# Altium PCB slave.PcbDoc (part 2 of 7)
Units mil, origin at the board's own origin, x right, y up, seen from the top; angles counter-clockwise.
Board outline 6299.21 x 3937.01 mil, 6 copper layers (Top Copper, FUSED_VBAT-, Signal Layer 2, Signal Layer 3, VREG, Bot Copper), stack 65.355 mil thick; 495 components, 307 nets, 1435 pads, 1866 vias.
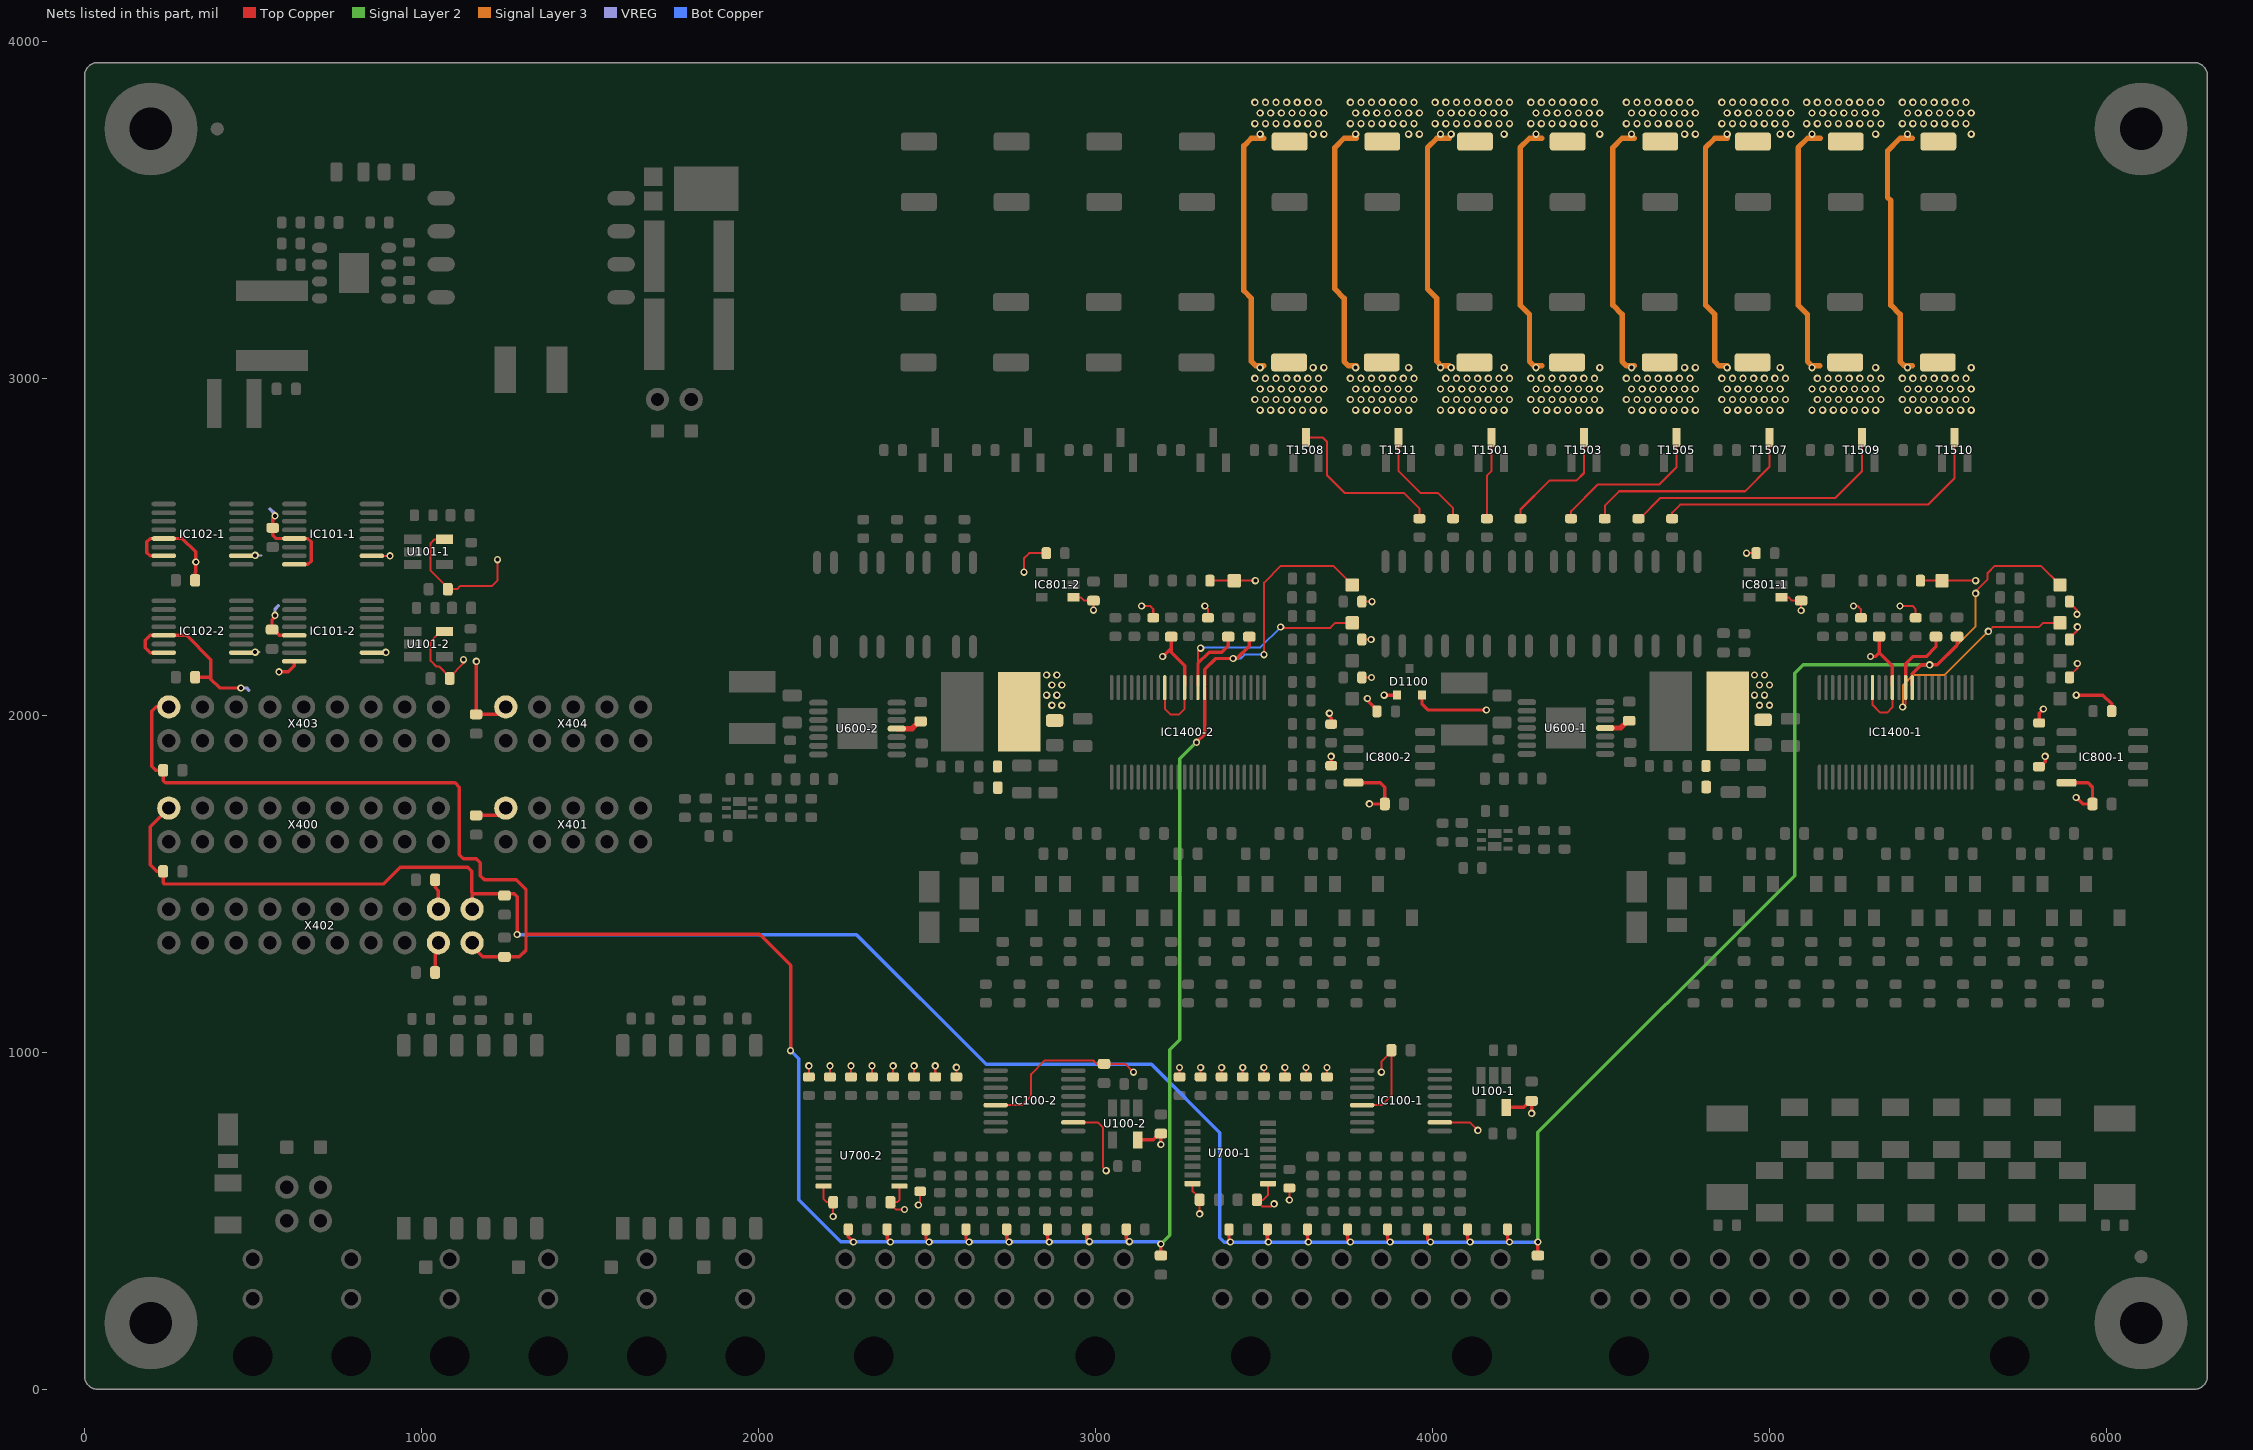
[diagram p6: the nets of this part, all layers, seen from the top]

## Footprints (in the part's own frame and the unit in brackets; to place one, negate y for a bottom-side part, rotate by r counter-clockwise, add the part's x,y. Pads: shape width x height; smd on the part's side, far side on the other; paste and mask are expansions set on the pad) (continued)
RESC2012X05N [mm] "Chip Resistor, 2-Leads, Body 2,00x1,20mm, IPC Medium Density"
  rrect40% 0.95x1.3 smd: 1(-0.925,0) 2(0.925,0)
  silkscreen extent -0.05,-0.55 0.05,0.55, body extent -1.05,-0.65 1.05,0.65, height 0.5
RESC5025X07N [mm] "Chip Resistor, 2-Leads, Body 5,00x2,50mm, IPC Medium Density"
  rrect30% 1.35x2.7 smd: 1(-2.275,0) 2(2.275,0)
  silkscreen extent -1.2,-1.25 1.2,1.25, body extent -2.6,-1.35 2.6,1.35, height 0.7
SOIC127P600X175-8N [mm] "SOIC, 8-Leads, Body 4,90x3,90mm, Pitch 1,27mm, IPC Medium Density"
  rrect50% 1.5x0.6 smd: 1(-2.7,1.905) 2(-2.7,0.635) 3(-2.7,-0.635) 4(-2.7,-1.905) 5(2.7,-1.905) 6(2.7,-0.635) 7(2.7,0.635) 8(2.7,1.905)
  silkscreen extent -2.8,-2.45 1.55,2.8, body extent -3,-2.45 3,2.45, height 1.75
SOIC127P700X220-4N [mm] "SOIC, 4-Leads, Body 2,60x4,40mm, Pitch 1,27mm, IPC Medium Density"
  oval 1.75x0.6 smd: 1(-3.175,0.635) 2(-3.175,-0.635) 3(3.175,-0.635) 4(3.175,0.635)
  silkscreen extent -3.3,-1.45 1.9,1.61, body extent -3.5,-1.45 3.5,1.45, height 2.2
SOT-23-OT5_L [mm] "SOT23, 5-Leads, Body 2.9x1.7mm, Pitch 0.95mm, Lead Span 2.8mm, IPC High Density"
  rect 0.9x0.65 smd: 1(-1.2,0.95) 2(-1.2,0) 3(-1.2,-0.95) 4(1.2,-0.95) 5(1.2,0.95)
  silkscreen extent -1.33,-1.55 0.35,1.95, body extent -0.9,-1.55 0.9,1.55, height 1.45
Testpoint_S1 [mm] "Testpunkt, quardratisch 1mm"
  rrect20% 1x1 smd paste-0.5: 1(0,0)
TYS6045221M-10 [mm] "Precision Wire Wound Inductor, 2-Leads, Body 6,00x6,00mm, IPC Medium Density"
  rect 3.2x6 smd: 1(-2.15,0) 2(2.15,0)
  silkscreen extent -4.05,-3.15 0.15,3.15, body extent -3.1,-3 3.1,3, height 4.8
VISH-DO-214AC-2_N [mm] "DO-214AC, 2-Leads, Body 4.5x2.79mm, IPC Medium Density"
  rect 2.4x1.55 smd: 1(-1.525,0) 2(1.525,0)
  silkscreen extent -3.4,-1.4 2.25,1.4, body extent -2.25,-1.4 2.25,1.39, height 2.29
"WE-LQS 4018" [mm] "SMD Power Inductor, 2-Leads, Body 4.0x4.0mm"
  rect 1.1x3.7 smd: 1(-1.5,0) 2(1.5,0)
  body extent -2,-2 2,2, height 1.78
WE_750313457 [mm] "Würth Elektronik 750313457"
  oval 2.08x1.07 smd: 1(-6.78,-3.735) 2(-6.78,-1.245) 3(-6.78,1.245) 4(-6.78,3.735) 5(6.78,3.735) 6(6.78,1.245) 7(6.78,-1.245) 8(6.78,-3.735)
  silkscreen extent -6.98,-6.65 5.43,6.65, body extent -7.62,-6.65 7.62,6.65, height 11.44

## Part data
C100-1 C100-2 C400 C401 C402 C403 C404 C405 C406 C407 C601-1 C601-2 C604-1 C604-2 C605-1 C605-2 C700-1 C700-2 C701-1 C701-2 C800-1 C800-2 C801-1 C801-2 C906 C1100: library part gen_C_ceramic_100n_50V_X7R_0603, "MLCC", Capacitance=100n, Case EIA=0603, Case Metric=1608, Dielectric=X7R, PnP Package=C_0603_10, PnP Value=100n/50V/X7R, Rated Voltage=50V, Supplier Part Number 1=2525267, Part Number=gen_C_ceramic_100n_50V_X7R_0603, PnP equipped=x, Supplier 1=Farnell, Supplier 2=Digikey, Supplier Part Number 2=490-6049-1-ND
  C100-1 C100-2 C601-1 C601-2 C604-1 C604-2 C605-1 C605-2 C700-1 C700-2 C701-1 C701-2: Automotive Qualified=True, Supplier 3=Farnell, Supplier Part Number 3=2070398
  C400 C401 C402 C403 C404 C405 C406 C407 C800-1 C800-2 C801-1 C801-2 C906 C1100: Automotive Qualified=False
C101-1 C101-2 C110-1 C110-2 C112-1 C112-2 C113-1 C113-2 C114-1 C114-2 C606-1 C606-2 C904 C907 C1401-1 C1401-2 C1402-1 C1402-2 C1403-1 C1403-2: library part gen_C_ceramic_1u_35V_X7R_0603, "MLCC", Capacitance=1u, Case EIA=0603, Case Metric=1608, Dielectric=X7R, PnP Package=C_0603_10, PnP Value=1uF/35V/X7R, Rated Voltage=35V, Supplier Part Number 1=1907508, Automotive Qualified=False, Part Number=gen_C_ceramic_1u_35V_X7R_0603, PnP equipped=x, Supplier 1=Farnell
C102-1 C102-2 C103-1 C103-2 C104-1 C104-2 C105-1 C105-2 C106-1 C106-2 C107-1 C107-2 C108-1 C108-2 C109-1 C109-2 C600-1 C600-2: library part gen_C_ceramic_10n_100V_X7R_0603, "MLCC", Capacitance=10n, Case EIA=0603, Case Metric=1608, Dielectric=X7R, Rated Voltage=100V, Supplier Part Number 1=1301715, Automotive Qualified=True, Part Number=gen_C_ceramic_10n_100V_X7R_0603, Supplier 1=Farnell, Supplier 2=Farnell, Supplier 3=Farnell, Supplier Part Number 2=2821192, Supplier Part Number 3=2210878
C111-1 C111-2 C115-1 C115-2 C1300-1 C1300-2 C1301-1 C1301-2 C1302-1 C1302-2 C1303-1 C1303-2 C1304-1 C1304-2 C1305-1 C1305-2 C1306-1 C1306-2 C1307-1 C1307-2 C1308-1 C1308-2 C1309-1 C1309-2 C1310-1 C1310-2 C1311-1 C1311-2 C1312-1 C1312-2 C1313-1 C1313-2 C1314-1 C1314-2 C1315-1 C1315-2 C1316-1 C1316-2 C1317-1 C1317-2 C1318-1 C1318-2 C1319-1 C1319-2 C1320-1 C1320-2 C1321-1 C1321-2 C1322-1 C1322-2 C1323-1 C1323-2: library part gen_C_ceramic_10n_100V_X7R_0603, "MLCC", Capacitance=10n, Case EIA=0603, Case Metric=1608, Dielectric=X7R, Rated Voltage=100V, Supplier Part Number 1=1865545, Automotive Qualified=False, Part Number=gen_C_ceramic_10n_100V_X7R_0603, Supplier 1=Farnell
C602-1 C602-2: library part gen_C_ceramic_1u_250V_X7R_1812, "MLCC", Capacitance=1u, Case EIA=1812, Case Metric=4532, Dielectric=X7T, Rated Voltage=250V, Supplier Part Number 1=2435499, Automotive Qualified=True, Part Number=gen_C_ceramic_1u_250V_X7R_1812, Supplier 1=Farnell
C603-1 C603-2 C1400-1 C1400-2: library part gen_C_ceramic_100n_100V_X7R_0805, "MLCC", Capacitance=100n, Case EIA=0805, Case Metric=2012, Dielectric=X7R, Rated Voltage=100V, Supplier Part Number 1=2320821, Automotive Qualified=False, Part Number=gen_C_ceramic_100n_100V_X7R_0805, Supplier 1=Farnell
C607-1 C607-2 C608-1 C608-2: library part gen_C_ceramic_2u2_10V_X7R_0805, "MLCC", Capacitance=2u2, Case EIA=0805, Case Metric=2012, Dielectric=X7R, Rated Voltage=10V, Supplier Part Number 1=2478259, Automotive Qualified=True, Part Number=gen_C_ceramic_2u2_10V_X7R_0805, Supplier 1=Farnell, Supplier 2=Farnell, Supplier Part Number 2=2070513
C900 C901: library part gen_C_ceramic_2u2_250V_X7R_2220, "MLCC", Capacitance=2u2, Case EIA=2220, Case Metric=5750, Dielectric=X7R, Rated Voltage=250V, Supplier Part Number 1=445-7997-2-ND, Automotive Qualified=True, Part Number=gen_C_ceramic_2u2_250V_X7R_2220, Supplier 1=Digikey
C902: library part gen_C_ceramic_470p_100V_X7R_0805, "MLCC", Capacitance=470p, Case EIA=0805, Case Metric=2012, Dielectric=X7R, Rated Voltage=100V, Supplier Part Number 1=1759283, Automotive Qualified=False, Part Number=gen_C_ceramic_470p_100V_X7R_0805, Supplier 1=Farnell
C903: library part gen_C_ceramic_4n7_1000V_X7R_1812, "MLCC", Capacitance=4n7, Case EIA=1812, Case Metric=4532, Dielectric=X7R, Rated Voltage=1000V, Supplier Part Number 1=1702159, Automotive Qualified=False, Part Number=gen_C_ceramic_4n7_1000V_X7R_1812, Supplier 1=Farnell
C905: library part gen_C_ceramic_22u_50V_X7R_2220_stacked, "MLCC", Capacitance=22u, Case EIA=2220, Case Metric=5750, Dielectric=X7R, Rated Voltage=50V, Supplier Part Number 1=399-5797-1-ND, Automotive Qualified=True, Part Number=gen_C_ceramic_22u_50V_X7R_2220_stacked, Supplier 1=Digikey
C1404-1 C1404-2 C1405-1 C1405-2: library part gen_C_ceramic_100p_50V_C0G_0603, "MLCC", Capacitance=100p, Case EIA=0603, Case Metric=1608, Dielectric=C0G, Rated Voltage=50V, Supplier Part Number 1=1414603, Automotive Qualified=False, Part Number=gen_C_ceramic_100p_50V_C0G_0603, Supplier 1=Farnell
D900: library part PDS3200-13, "Schottky Diode 3A 200V 780mV", Breakdown Voltage=200V, Continuous Forward Current=3A, Manufacturer="DIODES Inc", Operating Temperature="-65°C - +150°C", Supplier Part Number 1=1713904, Automotive Qualified=True, ComponentLink1Description=Datasheet, ComponentLink1URL=http://www.farnell.com/datasheets/2238298.pdf, Part Name=PDS3200, Part Number=PDS3200-13, Supplier 1=Farnell
D901 D1400-1 D1400-2: library part CMP-2000-05099-1, "1 A High Voltage Schottky Barrier Rectifier, 0.62 V, -55 to 175 degC, 2- Pin POWERDI123, Pb-Free, Tape and Reel", Average Rectified Current-Max=1A, Forward Voltage=0.77V, Manufacturer="Diodes Inc", Peak Current-Max=40A, Reverse Current-Max=1µA, Reverse Voltage-Max [Vrrm]=100V, Datasheet URL=https://datasheet.ciiva.com/15144/getdatasheetpartid-44146-15144126.pdf, Datasheet Version=Sep-14, Manufacturer URL=http://www.diodes.com/
D1100: library part CMP-2000-04915-1, "Schottky Barrier Diode, 30 V, 3-Pin SOT23, RoHS, Tape and Reel", Current Ifsm=600mA, Diode Case Style=SOT-23, Forward Current If(AV)=200mA, Forward Voltage=800mV, Junction Temperature Tj Max=125degC, Manufacturer="NXP Semiconductors", Operating Temperature Max=150degC, Operating Temperature Min=-65degC, Operating Temperature Range=-65degCto+150degC, Package Description="3-Pin Small Outline Transistor, Body 1.3 x 2.9 mm, Pitch 0.95 mm", Package Reference=SOT23-3, Package Version=Feb-16, Repetitive Reverse Voltage Vrrm Max=30V, Common Connection=Cathode, Datasheet URL=https://datasheet.ciiva.com/33723/1668625-33723936.pdf, Datasheet Version="Rev. 5 , 10/2012", Diode Type=Schottky, Forward Surge Current Ifsm Max=600mA, Forward Voltage VF Max=800mV, Manufacturer URL=http://www.nxp.com/, No. of Pins=3, Package / Case=SOT-23, Package URL=http://www.nxp.com/documents/outline_drawing/SOT23.pdf, Pin Configuration=1A1,2A2,3comK, Reel Quantity=3000, Reverse Recovery Time trr Max=5ns, Reverse Recovery Time trr Typ=5ns, SMD Marking=L43/*W1, SVHC=NoSVHC(19-Dec-2012), Tape Width=8mm, Termination Type=SMD
D1401-1 D1401-2: library part CMP-0548-00258-2, "Transient Voltage Suppressor, 6.40 to 231 V, 60 V Stand-off Voltage, Uni-Directional, -55 to 155 degC, 2-pin DO-214AC, Pb-Free, Tape and Reel", Manufacturer="Vishay Semiconductor", Operating Junction and Storage Temperature Range="-55 to 150 degC", ComponentLink1Description="Manufacturer URL", ComponentLink1URL=http://www.vishay.com/, ComponentLink2Description=Datasheet, ComponentLink2URL=http://www.vishay.com/docs/88390/smaj50a.pdf, ComponentLink3Description="Package Specification", ComponentLink3URL=http://www.vishay.com/docs/88390/smaj50a.pdf, DatasheetVersion=12/8/2013, ID (uA)=1, IFSM="40 A", Mounting Technology="Surface Mount", PackageDescription="2-Pin DO-214AC (SMA), Body 4.245 x 2.665 mm", PackageReference=DO-214AC-2, Packing="Tape and Reel", PartNumber=SMAJ60A-E3/61, PPPM (W)="400, 300", RoHS=TRUE, VBR Uni-Directional (V)="6.4 to 231", VWM (V)=60
Designator26 Designator27 Designator28-1 Designator29: library part Hole_3.2_Iso
F300 F314: "Fuse, Surface Mount, NANO2 Series, 500 mA, 125 VAC, 32 VDC, Very Fast Acting, SMD", Manufacturer=Littlefuse, Operating Temperature="-55°C - +125°C", Supplier Part Number 1=1596919, Automotive Qualified=False, ComponentLink1Description=Datasheet, ComponentLink1URL=http://www.farnell.com/datasheets/1792947.pdf, Part Number=fuse_0.5A_0448.500MR, Supplier 1=Farnell
F301 F302 F303 F304 F305 F306 F307 F308 F309 F310 F311 F312 F313: "Fuse, Surface Mount, 466 Series, 250 mA, 125 VAC, 125 VDC, Very Fast Acting, 1206", Manufacturer=Littlefuse, Operating Temperature="-55°C - +90°C", Supplier Part Number 1=9921826, Automotive Qualified=False, ComponentLink1Description=Datasheet, ComponentLink1URL=http://www.farnell.com/datasheets/1796765.pdf, Part Number=fuse_0.25A_0466.250NR, Supplier 1=Farnell
F900: "Fuse, Surface Mount, 466 Series, 1.25 A, 63 VAC, 63 VDC, Very Fast Acting, 1206", Manufacturer=Littlefuse, Operating Temperature="-55°C - +90°C", Supplier Part Number 1=1596526, Automotive Qualified=False, ComponentLink1Description=Datasheet, ComponentLink1URL=http://www.farnell.com/datasheets/1796765.pdf, Part Number=fuse_1.25A_04661.25NR, Supplier 1=Farnell
IC100-1 IC100-2 IC101-1 IC101-2 IC102-1 IC102-2: library part CMP-0798-00197-1, "CMOS, Low Voltage, 2-Wire Serially Controlled, Matrix Switch, -40 to 85 degC, 16-pin SOP (RU-16), Tube", Manufacturer="Analog Devices", Bandwidth (Hz)=65M, Code_JEDEC=MO-153AB, ComponentLink1Description="Manufacturer URL", ComponentLink1URL=http://www.analog.com/en/index.html, ComponentLink2Description=Datasheet, ComponentLink2URL=http://www.analog.com/static/imported-files/data_sheets/ADG728_729.pdf, ComponentLink3Description="Package Specification", ComponentLink3URL=http:/www.analog.com/static/imported-files/packages/36244347913743854010197452789RU16.pdf, DatasheetVersion="Rev. C", Max Analog Signal Range="0 to Vdd", Mounting Technology="Surface Mount", PackageDescription="16-Pin Thin Shrink Small Outline Package, Body 5 x 4.4 mm, Pitch 0.65 mm", PackageReference=RU-16, PackageVersion=Nov-02, Packing=Tube, PartNumber=ADG728BRUZ, Ron (ohms)=2.5, Supply V Guar Performance="Single_(+3V), Single_(+5V)"
IC800-1 IC800-2: "Automotive 2-Mbit serial I²C  / bus EEPROM with 1 MHz clock", Manufacturer=STMicroelectronics, Operating Temperature="-40°C - +125°C", PnP Package=SO8N, Supplier Part Number 1=497-16238-1-ND, Automotive Qualified=True, ComponentLink1Description=Datasheet, ComponentLink1URL=http://www.st.com/content/ccc/resource/technical/document/datasheet/83/f4/3e/e4/4e/49/42/c5/DM00200595.pdf/files/DM00200595.pdf/jcr:content/translations/en.DM00200595.pdf, Part Name=M24M02-DWMN3TP/K, Part Number=M24M02-DWMN3TP/K, Supplier 1=Digikey, Supplier 2=Mouser, Supplier Part Number 2=511-M24M02-DWMN3TP/K
IC801-1 IC801-2: library part CMP-0192-00211-1, "2-Wire High-Accuracy Temperature Sensor, Slave Address 000, 5-Pin SOT-23, -55°C to +125°C Temperature, Tape and Reel", Code_IPC=SOT23-5, DatasheetVersion="revD, Nov-2010", PackageDescription="5-Lead Plastic Small Outline Transistor (OT) [SOT-23]", PackageReference=SOT-23-OT5, PackageVersion="revBB, Aug-2009"
IC900: library part CMP-0492-02715-1, "Micropower No-Opto Isolated Flyback Converter, 2.8 to 42 V, -40 to 150 degC, 8-Pin SOIC (S8E), RoHS, Tube", Output Current="3.6 A", PartNumber=LT8302, Temperature Max="150 degC", Temperature Min="-40 degC", ComponentLink1Description="Manufacturer URL", ComponentLink1URL=http://www.linear.com/, ComponentLink2Description=Datasheet, ComponentLink2URL=http://cds.linear.com/docs/en/datasheet/8302fa.pdf, ComponentLink3Description="Package Specification", ComponentLink3URL=http://cds.linear.com/docs/en/packaging/05081857_A_S8E.pdf, DatasheetVersion="Rev. A", Mounting Technology="Surface Mount", Number of Outputs=1, PackageDescription="8-Pin Plastic Small Outline Integrated Circuit Package, Body 4.90 x 3.90 mm, Pitch 1.27 mm", PackageVersion="Rev. A, 10/2013", Packing=Tube, RoHS=TRUE, VIN Max="42 V", VIN Min="2.8 V"
IC1400-1 IC1400-2: "Multicell Battery Monitor, 60 V Vin MAX, 48-pin SOP (G-48), -40 to 125 degC, Pb-Free", Manufacturer="Linear Technology", Operating Temperature="-40°C - +125°C", Supplier Part Number 1=LTC6811HG-1#PBF-ND, Automotive Qualified=False, Battery Chemistry="Li-Ion, Li-Polymer, NiMH", ComponentLink1Description=Datasheet, ComponentLink1URL=https://cds.linear.com/docs/en/datasheet/68111fb.pdf, ComponentLink2Description=Datasheet, ComponentLink2URL=http://cds.linear.com/docs/en/datasheet/680412f.pdf, ComponentLink3Description="Package Specification", ComponentLink3URL=http://cds.linear.com/docs/en/packaging/05081887_0_G48.pdf, Mounting Technology="Surface Mount", Number of Cells="> 1000 V of stacked Li-Ion cells", PackageDescription="48-Pin Plastic SSOP, Body 12.8 x 5.3 mm, Pitch 0.5 mm", PackageReference=G-48, PackageVersion="Rev. Ø, 01/2011", Part Name=LTC6811HG-1#PBF, Part Number=LTC6811HG-1#PBF, PartNumber=LTC6811HG-1#PBF, RoHS=TRUE, Supplier 1=Digikey, Type of Charger="Battery Stack Monitor", Vin Max(V)=60
L600-1 L600-2: library part TYS6045221M-10, "Power Inductor", Manufacturer="Laird-Signal Integrity Products", Operating Temperature="-55°C - +150°C", Rated Current=590mA, Saturation Current=700mA, Supplier Part Number 1=240-2742-1-ND, Automotive Qualified=True, ComponentLink1Description=Datasheet, ComponentLink1URL=http://assets.lairdtech.com/home/brandworld/files/TYS6045221M-10.pdf, Inductance=220µH, Part Number=TYS6045221M-10, Supplier 1=Digikey
L900: library part CMP-1354-00028-1, "WE-LQS SMD Power Inductor, L=10 µH", Inductance="10 µH", Manufacturer="Wuerth Elektronik", ComponentLink1Description="Manufacturer URL", ComponentLink1URL=http://www.we-online.com, ComponentLink2Description=Datasheet, ComponentLink2URL=http://katalog.we-online.de/pbs/datasheet/74404042100.pdf, PackageReference="WE-LQS 4018", PartNumber=74404042100
LD1400-1 LD1400-2: library part gen_LED_0603_green, "LED", Breakdown Voltage=5V, Color=green, Continuous Forward Current=20mA, Forward Voltage @ 20mA=2.2V, PnP Package=LED_0603, Supplier Part Number 1=2099223, Automotive Qualified=False, Part Number=gen_LED_0603_green, Supplier 1=Farnell
Q600-1 Q600-2: "Dual NPN/PNP Transistor", Manufacturer=Nexperia, Maximum Continous Drain Current (25°C)=1A, Maximum Drain-Source Voltage=120V, Operating Temperature="-55°C - +150°C", Part Name="DUAL PNP/NPN", Automotive Qualified=True, ComponentLink1Description=Datasheet, ComponentLink1URL=https://assets.nexperia.com/documents/data-sheet/PBSS4112PANP.pdf, Part Number=PBSS4112PANP, Supplier 2=Digikey, Supplier 3=Mouser, Supplier Part Number 2=1727-1068-1-ND, Supplier Part Number 3=771-PBSS4112PANP
R100-1 R100-2 R101-1 R101-2 R102-1 R102-2 R103-1 R103-2 R104-1 R104-2 R105-1 R105-2 R106-1 R106-2 R107-1 R107-2 R600-1 R600-2 R604-1 R604-2 R609-1 R609-2 R700-1 R700-2 R701-1 R701-2 R702-1 R702-2 R703-1 R703-2 R704-1 R704-2 R705-1 R705-2 R706-1 R706-2 R707-1 R707-2 R708-1 R708-2 R800-1 R800-2 R801-1 R801-2 R904 R1112 R1404-1 R1404-2 R1408-1 R1408-2 R1411-1 R1411-2: library part gen_R_10k_0603, "SMD Resistor 10k 0603", Case EIA=0603, Case Metric=1608, Maximum Working Voltage=75V, Operating Temperature="-55°C - +155°C", PnP Package=R_0603, Power=0.1W, Supplier Part Number 1=2073349, Tolerance=1%, Part Number=gen_R_10k_0603, PnP Value=10k, Resistance=10k, Series="E24, E96", Supplier 1=Farnell
  R100-1 R100-2 R101-1 R101-2 R102-1 R102-2 R103-1 R103-2 R104-1 R104-2 R105-1 R105-2 R106-1 R106-2 R107-1 R107-2 R600-1 R600-2 R604-1 R604-2 R609-1 R609-2 R708-1 R708-2 R1404-1 R1404-2 R1408-1 R1408-2 R1411-1 R1411-2: Automotive Qualified=True
  R700-1 R700-2 R701-1 R701-2 R702-1 R702-2 R703-1 R703-2 R704-1 R704-2 R705-1 R705-2 R706-1 R706-2 R707-1 R707-2 R800-1 R800-2 R801-1 R801-2 R904 R1112: Automotive Qualified=False
R108-1 R108-2 R109-1 R109-2 R110-1 R110-2 R111-1 R111-2 R112-1 R112-2 R113-1 R113-2 R114-1 R114-2 R115-1 R115-2: library part gen_R_100R_0603, "SMD Resistor 100R 0603", Case EIA=0603, Case Metric=1608, Maximum Working Voltage=75V, Operating Temperature="-55°C - +155°C", PnP Package=R_0603, Power=0.1W, Supplier Part Number 1=P100HCT-ND, Tolerance=1%, Automotive Qualified=True, Part Number=gen_R_100R_0603, PnP Value=100R, Resistance=100R, Series="E24, E96", Supplier 1=Digikey
R116-1 R116-2 R118-1 R118-2 R1300-1 R1300-2 R1301-1 R1301-2 R1302-1 R1302-2 R1303-1 R1303-2 R1304-1 R1304-2 R1305-1 R1305-2 R1306-1 R1306-2 R1307-1 R1307-2 R1308-1 R1308-2 R1309-1 R1309-2 R1310-1 R1310-2 R1311-1 R1311-2 R1312-1 R1312-2: library part gen_R_100R_0603, "SMD Resistor 100R 0603", Case EIA=0603, Case Metric=1608, Maximum Working Voltage=75V, Operating Temperature="-55°C - +155°C", PnP Package=R_0603, Power=0.1W, Supplier Part Number 1=1469752, Tolerance=1%, Automotive Qualified=False, Part Number=gen_R_100R_0603, PnP Value=100R, Resistance=100R, Series="E24, E96", Supplier 1=Farnell
R117-1 R117-2 R119-1 R119-2 R601-1 R601-2 R605-1 R605-2: library part gen_R_0R_0603, "SMD Resistor 0R 0603", Case EIA=0603, Case Metric=1608, Maximum Working Voltage=75V, Operating Temperature="-55°C - +155°C", PnP Package=R_0603, Power=0.1W, Supplier Part Number 1=2616580, Automotive Qualified=True, Part Number=gen_R_0R_0603, PnP Value=0R, Resistance=0R, Series=Jumper, Supplier 1=Farnell
R602-1 R602-2: library part gen_R_68k_0603, "SMD Resistor 68k 0603", Case EIA=0603, Case Metric=1608, Maximum Working Voltage=75V, Operating Temperature="-55°C - +155°C", PnP Package=R_0603, Power=0.1W, Tolerance=1%, Automotive Qualified=False, Part Number=gen_R_68k_0603, PnP Value=68k, Resistance=68k, Series=E24
R603-1 R603-2 R608-1 R608-2: library part gen_R_124k_0603, "SMD Resistor 124k 0603", Case EIA=0603, Case Metric=1608, Maximum Working Voltage=75V, Operating Temperature="-55°C - +155°C", PnP Package=R_0603, Power=0.1W, Supplier Part Number 1=2138508, Tolerance=1%, Automotive Qualified=True, Part Number=gen_R_124k_0603, PnP Value=124k, Resistance=124k, Series=E96, Supplier 1=Farnell
R606-1 R606-2: library part gen_R_1k5_0603, "SMD Resistor 1k5 0603", Case EIA=0603, Case Metric=1608, Maximum Working Voltage=75V, Operating Temperature="-55°C - +155°C", PnP Package=R_0603, Power=0.1W, Supplier Part Number 1=2616745, Tolerance=1%, Automotive Qualified=True, Part Number=gen_R_1k5_0603, PnP Value=1k5, Resistance=1k5, Series="E24, E96", Supplier 1=Farnell
R607-1 R607-2: library part gen_R_1R_0805, "SMD Resistor 1R 0805", Case EIA=0805, Case Metric=2012, Maximum Working Voltage=150V, Operating Temperature="-55°C - +155°C", PnP Package=R_0805, Power=0.125W, Supplier Part Number 1=2616757, Tolerance=1%, Automotive Qualified=True, Part Number=gen_R_1R_0805, PnP Value=1R, Resistance=1R, Series="E24, E96", Supplier 1=Farnell
R610-1 R610-2: library part gen_R_1k_0603, "SMD Resistor 1k 0603", Case EIA=0603, Case Metric=1608, Maximum Working Voltage=75V, Operating Temperature="-55°C - +155°C", PnP Package=R_0603, Power=0.1W, Supplier Part Number 1=1652848, Tolerance=1%, Automotive Qualified=True, Part Number=gen_R_1k_0603, PnP equipped=x, PnP Value=1k, Resistance=1k, Series="E24, E96", Supplier 1=Farnell
R900: library part gen_R_39R_0805, "SMD Resistor 39R 0805", Case EIA=0805, Case Metric=2012, Maximum Working Voltage=150V, Operating Temperature="-55°C - +155°C", PnP Package=R_0805, Power=0.125W, Supplier Part Number 1=1750736, Tolerance=1%, Automotive Qualified=False, Part Number=gen_R_39R_0805, PnP Value=39R, Resistance=39R, Series=E24, Supplier 1=Farnell
R901: library part gen_R_390k_0603, "SMD Resistor 390k 0603", Case EIA=0603, Case Metric=1608, Maximum Working Voltage=75V, Operating Temperature="-55°C - +155°C", PnP Package=R_0603, Power=0.1W, Supplier Part Number 1=2303278, Tolerance=1%, Automotive Qualified=False, Part Number=gen_R_390k_0603, PnP Value=390k, Resistance=390k, Series=E24, Supplier 1=Farnell
R902: library part gen_R_150k_0603, "SMD Resistor 150k 0603", Case EIA=0603, Case Metric=1608, Maximum Working Voltage=75V, Operating Temperature="-55°C - +155°C", PnP Package=R_0603, Power=0.1W, Tolerance=1%, Automotive Qualified=False, Part Number=gen_R_150k_0603, PnP Value=150k, Resistance=150k, Series="E24, E96"
R903: library part gen_R_115k_0603, "SMD Resistor 115k 0603", Case EIA=0603, Case Metric=1608, Maximum Working Voltage=75V, Operating Temperature="-55°C - +155°C", PnP Package=R_0603, Power=0.1W, Supplier Part Number 1=2073367, Tolerance=1%, Automotive Qualified=False, Part Number=gen_R_115k_0603, PnP Value=115k, Resistance=115k, Series=E96, Supplier 1=Farnell
R905: library part gen_R_86k6_0603, "SMD Resistor 86k6 0603", Case EIA=0603, Case Metric=1608, Maximum Working Voltage=75V, Operating Temperature="-55°C - +155°C", PnP Package=R_0603, Power=0.1W, Supplier Part Number 1=2059490, Tolerance=1%, Automotive Qualified=False, Part Number=gen_R_86k6_0603, PnP Value=86k6, Resistance=86k6, Series=E96, Supplier 1=Farnell
R1100 R1101 R1102 R1103 R1104 R1105 R1106 R1107 R1108 R1109 R1110 R1111: library part gen_R_150R_0603, "SMD Resistor 150R 0603", Case EIA=0603, Case Metric=1608, Maximum Working Voltage=75V, Operating Temperature="-55°C - +155°C", PnP Package=R_0603, Power=0.1W, Supplier Part Number 1=1469760, Tolerance=1%, Automotive Qualified=False, Part Number=gen_R_150R_0603, PnP Value=150R, Resistance=150R, Series="E24, E96", Supplier 1=Farnell
R1400-1 R1401-2: library part gen_R_100R_0805, "SMD Resistor 100R 0805", Case EIA=0805, Case Metric=2012, Maximum Working Voltage=150V, Operating Temperature="-55°C - +155°C", PnP Package=R_0805, Power=0.125W, Supplier Part Number 1=1469862, Tolerance=1%, Automotive Qualified=False, Part Number=gen_R_100R_0805, PnP Value=100R, Resistance=100R, Series="E24, E96", Supplier 1=Farnell
R1400-2 R1401-1: library part gen_R_1M_0603, "SMD Resistor 1M 0603", Case EIA=0603, Case Metric=1608, Maximum Working Voltage=75V, Operating Temperature="-55°C - +155°C", PnP Package=R_0603, Power=0.1W, Supplier Part Number 1=1469746, Tolerance=1%, Automotive Qualified=False, Part Number=gen_R_1M_0603, PnP Value=1M, Resistance=1M, Series="E24, E96", Supplier 1=Farnell
R1402-1 R1402-2 R1403-1 R1403-2 R1405-1 R1405-2 R1406-1 R1407-2 R1409-1 R1409-2 R1410-1 R1410-2 R1412-1 R1412-2 R1413-1 R1413-2 R1414-1 R1414-2 R1417-1 R1417-2 R1418-1 R1418-2 R1419-2 R1420-1 SJ300 SJ301: library part gen_R_0R_0603, "SMD Resistor 0R 0603", Case EIA=0603, Case Metric=1608, Maximum Working Voltage=75V, Operating Temperature="-55°C - +155°C", PnP Package=R_0603, Power=0.1W, Supplier Part Number 1=2073345, Automotive Qualified=False, Part Number=gen_R_0R_0603, PnP Value=0R, Resistance=0R, Series=Jumper, Supplier 1=Farnell
R1406-2 R1407-1: library part gen_R_270R_0603, "SMD Resistor 270R 0603", Case EIA=0603, Case Metric=1608, Maximum Working Voltage=75V, Operating Temperature="-55°C - +155°C", PnP Package=R_0603, Power=0.1W, Supplier Part Number 1=2141320, Tolerance=1%, Automotive Qualified=False, Part Number=gen_R_270R_0603, PnP Value=270R, Resistance=270R, Series=E24, Supplier 1=Farnell
R1415-1 R1415-2 R1416-1 R1416-2 R1419-1 R1420-2: library part gen_R_1k21_0603, "SMD Resistor 1k21 0603", Case EIA=0603, Case Metric=1608, Maximum Working Voltage=75V, Operating Temperature="-55°C - +155°C", PnP Package=R_0603, Power=0.1W, Supplier Part Number 1=1652852, Tolerance=1%, Automotive Qualified=False, Part Number=gen_R_1k21_0603, PnP Value=1k21, Resistance=1k21, Series=E96, Supplier 1=Farnell
R1421-1 R1421-2: library part gen_R_820R_0603, "SMD Resistor 820R 0603", Case EIA=0603, Case Metric=1608, Maximum Working Voltage=75V, Operating Temperature="-55°C - +155°C", PnP Package=R_0603, Power=0.1W, Supplier Part Number 1=1469841, Tolerance=1%, Automotive Qualified=False, Part Number=gen_R_820R_0603, PnP Value=820R, Resistance=820R, Series=E24, Supplier 1=Farnell
R1422-1 R1422-2 R1423-1 R1423-2: library part gen_R_120R_0603, "SMD Resistor 120R 0603", Case EIA=0603, Case Metric=1608, Maximum Working Voltage=75V, Operating Temperature="-55°C - +155°C", PnP Package=R_0603, Power=0.1W, Supplier Part Number 1=2073369, Tolerance=1%, Automotive Qualified=False, Part Number=gen_R_120R_0603, PnP Value=120R, Resistance=120R, Series=E24, Supplier 1=Farnell
R1500 R1501 R1506 R1507 R1512 R1513 R1518 R1519 R1524 R1525 R1530 R1531: library part gen_R_3k3_0603, "SMD Resistor 3k3 0603", Case EIA=0603, Case Metric=1608, Maximum Working Voltage=75V, Operating Temperature="-55°C - +155°C", PnP Package=R_0603, Power=0.1W, Supplier Part Number 1=1469793, Tolerance=1%, Automotive Qualified=False, Part Number=gen_R_3k3_0603, PnP Value=3k3, Resistance=3k3, Series=E24, Supplier 1=Farnell
R1502 R1503 R1504 R1505 R1508 R1509 R1510 R1511 R1514 R1515 R1516 R1517 R1520 R1521 R1522 R1523 R1526 R1527 R1528 R1529 R1532 R1533 R1534 R1535: library part gen_R_68R_2010, "SMD Resistor 68R 2010", Case EIA=2010, Case Metric=5025, Maximum Working Voltage=200V, Operating Temperature="-55°C - +155°C", PnP Package=R_2010, Power=0.75W, Supplier Part Number 1=2323988, Tolerance=1%, Automotive Qualified=False, Part Number=gen_R_68R_2010, PnP Value=68R, Resistance=68R, Series=E24, Supplier 1=Farnell
T1500 T1501 T1502 T1503 T1504 T1505 T1506 T1507 T1508 T1509 T1510 T1511: library part CMP-1259-00090-1, "P-Channel Trench MOSFET, -20 V, -2 A, -55 to 150 degC, 3-Pin SOT23, Tape and Reel", Manufacturer="NXP Semiconductors", Automotive Qualified=Y, Channel Type=P, Code_JEDEC=TO-236AB, ComponentLink1Description="Manufacturer URL", ComponentLink1URL=http://www.nxp.com/, ComponentLink2Description=Datasheet, ComponentLink2URL=http://www.nxp.com/documents/data_sheet/NX2301P.pdf, ComponentLink3Description="Package Specification", ComponentLink3URL=http://www.nxp.com/documents/outline_drawing/sot023_po.pdf, DatasheetVersion="Rev. 1", ID [max] (A)=-2, IDM [max] (A)=-6, Mounting Technology="Surface Mount", PackageDescription="3-Pin Small Outline Transistor Package, Body 2.9 x 1.3 mm, Pitch 0.95 mm", PackageReference=SOT23, PackageVersion="06-03-16, 03/2006", Packing="Tape & Reel", PartNumber=NX2301P,215, VDS [max] (V)=-20, VGSth [typ] (V)=-0.75
TP900 TP901 TP902 TP903 TP1400-1 TP1400-2 TP1401-1 TP1401-2 TP1402-1 TP1402-2 TP1403-1 TP1403-2 TP1404-1 TP1404-2 TP1405-1 TP1405-2 TP1406-1 TP1406-2 TP1407-1 TP1407-2: "Testpoint, square", Part Number=Testpoint_Square
TR900: "MID-FLYLT Flyback Transformers for Linear Technology", Manufacturer="Würth Elektronik", Supplier Part Number 1=1297-1136-1-ND, Automotive Qualified=False, ComponentLink1Description=Datasheet, ComponentLink1URL=http://katalog.we-online.de/ctm/datasheet/750313457.pdf, ComponentLink2Description=Website, ComponentLink2URL=http://katalog.we-online.de/en/ctm/MID-FLYLT/750313457, Part Number=WE_750313457, Supplier 1=Digikey
TR1400-1 TR1400-2: "Pulse HM2102NL BMS Transformer", Manufacturer=Pulse, Operating Temperature="-40°C - +125°C", Supplier Part Number 1=673-HM2102NL, Automotive Qualified=True, ComponentLink1Description=Datasheet, ComponentLink1URL=https://www.mouser.com/ds/2/336/HM2102NL-1218600.pdf, Part Number=HM2102NL, Supplier 1=Mouser, Supplier 2=Digikey, Supplier Part Number 2=1840-1034-1-ND
U100-1 U100-2 U101-1 U101-2: library part CMP-0384-01512-2, "Single Channel RRIO Operational Amplifier, 2.5 MHz BW, 1 V/us SR, Industrial, 5-pin SOT23 (RJ-5), Reel", Amplifiers Per Package=1, Generic Part Number=AD8628, Input Bias Current=30pA, Input Offset Voltage=1uV, Manufacturer="Analog Devices", Automotive Qualified=Yes, Code_JEDEC=MO-178-AA, ComponentLink1Description="Manufacturer URL", ComponentLink1URL=http://www.analog.com/en/index.html, ComponentLink2Description=Datasheet, ComponentLink2URL=http://www.analog.com/static/imported-files/data_sheets/AD8628_8629_8630.pdf, ComponentLink3Description="Package Specification", ComponentLink3URL=http://www.analog.com/static/imported-files/packages/PKG_PDF/SOT-23(RJ)/RJ_5.pdf, ComponentLink4Description="Reference Circuit", ComponentLink4URL=http://www.analog.com/en/all-operational-amplifiers-op-amps/operational-amplifiers-op-amps/ad8628/products/product.html#product-recommendations, DatasheetVersion="Rev. I", Iq/Amp=1.1mA, Mounting Technology="Surface Mount", PackageDescription="5-Pin Small Outline Transistor Package, Body 2.9 x 1.6 mm, Pitch 0.95 mm", PackageReference=RJ-5, PackageVersion=121608-A, PartNumber=AD8628ARTZ-R2, RevisionNote="Reference Circuit URL fixed", Slew Rate=1V/us, Small Signal Bandwidth=2.5MHz, V Span Max=6V, V Span Min=2.7V
U600-1 U600-2: "Automotive DC/DC buck converter", Manufacturer="Texas Instruments", Operating Temperature="-40°C - +125°C", PnP Package=HTSSOP-14, Supplier Part Number 1=296-47791-1-ND, Automotive Qualified=True, Part Name=LM5161QPWPRQ1, Part Number=LM5161QPWPRQ1, Supplier 1=Digikey, Supplier 2=Mouser, Supplier Part Number 2=595-LM5161QPWPRQ1
U700-1 U700-2: library part CMP-0314-00338-2, "Low-Voltage 8-Bit I2C and SMBus I/O Expander, 1.65 to 5.5 V, -40 to 85 degC, 16-pin TSSOP (PW), Green (RoHS & no Sb/Br)", 5V Tolerant I/O=Yes, Manufacturer="Texas Instruments", Max Frequency(kHz)=400, # of I/Os=8, Code_JEDEC=MO-153, ComponentLink1Description=Datasheet, ComponentLink1URL=http://www.ti.com/general/docs/lit/getliterature.tsp?genericPartNumber=TCA6408A&fileType=pdf, Configuration Registers=Yes, DatasheetVersion=SCPS192C, Eco-Plan="Green (RoHS & no Sb/Br)", fSCLK(Max)(MHz)=400, I2C Address="0100 00x", Interrupt Output=Yes, Low Power=Yes, Mounting Technology="Surface Mount", No. of Outputs=8, PackageDescription="16-Pin Plastic Thin Small Outline Package 5 x 4.4 mm Body ,0.65 mm Pitch", PackageReference=PW0016A, PackageVersion="revG, Feb-2011", PartNumber=TCA6408APWR, Push-Pull I/O Type=Yes, Reset Input=Yes, SubFamily="I2C IO Expander", VCC(Max)(V)=5.5, VCC(Min)(V)=1.65, Vcc range(V)="1.65 to 5.5"
U1100 U1101 U1102 U1103 U1104 U1105 U1106 U1107 U1108 U1109 U1110 U1111: library part ACPL-217-56BE, "Optocoupler, Transistor Output, 1 Channel", Manufacturer="Broadcom Limited", Operating Temperature="-55°C - +110°C", Supplier Part Number 1=1602623, Automotive Qualified=False, ComponentLink1Description=Datenblatt, ComponentLink1URL=http://www.farnell.com/datasheets/45634.pdf, Part Name=ACPL-217, Part Number=ACPL-217-56BE, Supplier 1=Farnell
X200: "Micro-Fit 3.0 Right Angle Header, 3.00mm Pitch, Dual Row, 24 Circuits, with Snap-in Plastic Peg PCB Lock, Tin, Glow Wire Capable, Black, 43045-2400", Manufacturer=Molex, Operating Temperature="-40°C - +105°C", Part Name=MicroFit, Rated Current=8.5A, Rated Voltage=600V, Supplier Part Number 1=1012245, Automotive Qualified=False, Circuits=24, Part Number=molex_microfit_3_12x2_THT, Supplier 1=Farnell
X201 X202: "Micro-Fit 3.0 Right Angle Header, 3.00mm Pitch, Dual Row, 16 Circuits, with Snap-in Plastic Peg PCB Lock, Tin, Glow Wire Capable, Black, 43045-1600", Manufacturer=Molex, Operating Temperature="-40°C - +105°C", Part Name=MicroFit, Rated Current=8.5A, Rated Voltage=600V, Supplier Part Number 1=9961380, Automotive Qualified=False, Circuits=16, Part Number=molex_microfit_3_08x2_THT, Supplier 1=Farnell
X400 X403: "Standard Pinheader, THD, gerade, 2.54mm, 2-reihig", Operating Temperature="-40 °C - +105 °C", Part Name=PinHeader, Rated Current=3A, Rated Voltage=250V, Supplier Part Number 1=2025256, Automotive Qualified=False, Circuits=18, Part Number=gen_pinheader_2.54_2x9, Supplier 1=Farnell
X401 X404: "Standard Pinheader, THD, gerade, 2.54mm, 2-reihig", Operating Temperature="-40 °C - +105 °C", Part Name=PinHeader, Rated Current=3A, Rated Voltage=250V, Supplier Part Number 1=2578720, Automotive Qualified=False, Circuits=10, Part Number=gen_pinheader_2.54_2x5, Supplier 1=Farnell
X402: "Standard Pinheader, THD, gerade, 2.54mm, 2-reihig", Operating Temperature="-40 °C - +105 °C", Part Name=PinHeader, Rated Current=3A, Rated Voltage=250V, Supplier Part Number 1=2025257, Automotive Qualified=False, Circuits=20, Part Number=gen_pinheader_2.54_2x10, Supplier 1=Farnell
X500 X501 X502 X503 X1001 X1002: "Micro-Fit 3.0 Right Angle Header, 3.00mm Pitch, Dual Row, 2 Circuits, with Snap-in Plastic Peg PCB Lock, Tin, Glow Wire Capable, Black, 43045-0200", Manufacturer=Molex, Operating Temperature="-40°C - +105°C", Part Name=MicroFit, Rated Current=8.5A, Rated Voltage=600V, Supplier Part Number 1=1012251, Automotive Qualified=False, Circuits=2, Part Number=molex_microfit_3_01x2_THT, Supplier 1=Farnell
X900: "Standard Pinheader, THD, gerade, 2.54mm", Operating Temperature="-40 °C - +105 °C", Part Name=PinHeader, Rated Current=3A, Rated Voltage=250V, Supplier Part Number 1=2025248, Automotive Qualified=False, Circuits=2, Part Number=gen_pinheader_2.54_2, Supplier 1=Farnell
X1000: "Board-To-Board Connector, Vertical, 2.54 mm, 4 Contacts, Header, TSW Series, Through Hole, 2 Rows", Manufacturer=Samtec, Operating Temperature="-55°C - +125°C", Part Name=TSW-102-07-G-D, Rated Voltage="500V AC mated with SSW", Supplier Part Number 1=2025248, Automotive Qualified=False, Circuits=4, ComponentLink1Description=Datasheet, ComponentLink1URL=http://www.farnell.com/datasheets/1992055.pdf, Part Number=samtec_TSW-102-07-G-D, Supplier 1=Farnell
Z1300-1 Z1300-2 Z1301-1 Z1301-2 Z1302-1 Z1302-2 Z1303-1 Z1303-2 Z1304-1 Z1304-2 Z1305-1 Z1305-2 Z1306-1 Z1306-2 Z1307-1 Z1307-2 Z1308-1 Z1308-2 Z1309-1 Z1309-2 Z1310-1 Z1310-2 Z1311-1 Z1311-2: library part CMP-1060-00434-1, "Zener Voltage Regulator, 500 mW, 2-Pin SOD-123, Pb-Free, Tape and Reel", Manufacturer="On Semiconductor", ComponentLink1Description="Manufacturer URL", ComponentLink1URL=http://www.onsemi.com/, ComponentLink2Description=Datasheet, ComponentLink2URL=http://www.onsemi.com/pub_link/Collateral/MMSZ4678T1-D.PDF, ComponentLink3Description="Package Specification", ComponentLink3URL=http://www.onsemi.com/pub_link/Collateral/425-04.PDF, DatasheetVersion="Rev. 9", Mounting Technology="Surface Mount", PackageDescription="2-Pin SOD, Body 1.6 x 2.69 mm", PackageReference=SOD-123-2-425-04, PackageVersion="Rev. G, 10/2009", Packing="Tape and Reel", PartNumber=MMSZ4692T1G, P Max (W)=0.5, RoHS=Pb-Free, VZ Typ (V)=6.8

## Via types
v1: diameter 21.65, hole 11.81, Top Copper to Bot Copper, tented both sides, 1848 vias
v2: diameter 35.43, hole 23.62, Top Copper to Bot Copper, 15 vias
v3: diameter 29.53, hole 19.68, Top Copper to Bot Copper, tented both sides, 3 vias

## Nets (pads, with @x,y where several pads share a name; then routed paths per layer and width w, separated by ;. In a path a pad name is that pad's centre, name@x,y a point inside that pad or via, vN(x,y) a via of type N, cw(c..) or ccw(c..) an arc to the next point about the centre after c; other vN are vias at no path point)
+3.0V_VREF1_0: C1401-1.2 IC1400-1.35 TP1400-1.1 | length 891.9
  Top Copper w6: v1(5395,2025) 5403.74,2033.74 IC1400-1.35@5403.74,2088.68 ; v1(5649.21,2249.51) 5661.71,2262.01 5799.21,2262.01 5811.71,2274.51 TP1400-1.1@5861.71,2274.51
  Top Copper w10: IC1400-1.35@5403.74,2088.68 5403.74,2153.74 5424.51,2174.51 5464.51,2174.51 5493.75,2203.75 C1401-1.2@5493.75,2233.47
  Signal Layer 3 w6: v1@5386.71,2024.51 v1@5387.2,2025 ; v1(5395,2025) v1@5387.2,2025 ; v1(5649.21,2249.51) 5519.7,2120 5426.25,2120 5395.96,2089.71 5395.96,2033.76 v1@5387.2,2025
+3.0V_VREF1_1: C1401-2.2 IC1400-2.35 TP1400-2.1 | length 736
  Top Copper w6: 3303.74,2154.04 3303.74,2191.54 v1(3311.71,2199.51) ; v1(3549.21,2262.01) 3551.8,2259.42 3696.62,2259.42 3711.71,2274.51 TP1400-2.1@3761.71,2274.51
  Top Copper w10: IC1400-2.35@3303.74,2088.68 3303.74,2154.04 3336.71,2187.01 3374.21,2187.01 3393.71,2206.51 C1401-2.2@3393.71,2233.47
  Bot Copper w6: v1(3311.71,2199.51) 3314.03,2201.83 3489.03,2201.83 v1(3549.21,2262.01)
+3.0V_VREF2_0: C100-1.2 C401.2 C405.2 C1402-1.2 IC1400-1.34 R100-1.2 R101-1.2 R102-1.2 R103-1.2 R104-1.2 R105-1.2 R106-1.2 R107-1.2 TP1401-1.1 X400.17 X402.1 | length 8776.9
  Top Copper w6: v1(5611.71,2362.01) 5611.71,2368.64 5647.15,2404.08 5647.15,2422.49 5668.41,2443.75 5804.97,2443.75 TP1401-1.1@5861.71,2387.01
  Top Copper w10: X400.17@250,1725 195,1670 195,1556.41 214.4,1537.01 C405.2@233.17,1537.01 233.17,1503.05 236.71,1499.51 886.71,1499.51 936.71,1549.51 1136.71,1549.51 1149.21,1537.01 1149.21,1474.51 1150,1473.72 ; X402.1@1150,1425 1150,1473.72 ; v1(1283.59,1349.51) 1283.59,1462.01 1274.53,1471.06 1152.66,1471.06 1150,1473.72 ; R100-1.2@3395.79,474.31 3395.79,441.22 v1(3400,437.01) ; R104-1.2@3509.94,475 3509.94,439.57 v1(3512.5,437.01) ; R101-1.2@3628.69,475 3628.69,439.57 v1(3631.25,437.01) ; R105-1.2@3747.44,475 3747.44,445.48 v1(3755.91,437.01) ; R102-1.2@3866.19,475 3866.19,445.03 v1(3874.21,437.01) ; R106-1.2@3984.94,475 3984.94,445.82 v1(3993.75,437.01) ; R103-1.2@4103.69,475 4103.69,445.03 v1(4111.71,437.01) ; R107-1.2@4222.44,475 4222.44,442.92 v1(4228.35,437.01) ; C100-1.2@4312.5,397.29 v1(4312.5,437.01) ; IC1400-1.34@5423.43,2088.68 5423.43,2123.72 5436.71,2137.01 5449.7,2150 v1(5475,2150) 5497.5,2150 5556.25,2208.75 C1402-1.2@5556.25,2233.47
  Signal Layer 2 w10: v1(4312.5,437.01) 4312.5,762.5 5074.51,1524.51 5074.51,2124.51 5100,2150 v1(5475,2150)
  Signal Layer 3 w6: v1(5475,2150) 5497.44,2150 5611.71,2264.27 v1(5611.71,2362.01)
  Bot Copper w10: v1(1283.59,1349.51) 2290.51,1349.51 2675.2,964.83 3102.52,964.83 3102.63,964.94 3122.37,964.94 3122.48,964.83 3133.77,964.83 3133.88,964.94 3153.62,964.94 3153.73,964.83 3165.91,964.83 3368.75,761.98 3368.75,450 3381.74,437.01 v1(3400,437.01) v1(3512.5,437.01) v1(3631.25,437.01) v1(3755.91,437.01) v1(3874.21,437.01) v1(3993.75,437.01) v1(4111.71,437.01) v1(4228.35,437.01) v1(4312.5,437.01)
+3.0V_VREF2_1: C100-2.2 C402.2 C407.2 C1402-2.2 IC1400-2.34 R100-2.2 R101-2.2 R102-2.2 R103-2.2 R104-2.2 R105-2.2 R106-2.2 R107-2.2 TP1401-2.1 X402.2 X403.17 | length 7583.2
  Top Copper w6: v1(3500,2180) 3500,2393.75 3550,2443.75 3704.97,2443.75 TP1401-2.1@3761.71,2387.01
  Top Copper w10: C407.2@227.66,1837.01 211.71,1837.01 199.21,1849.51 199.21,2012.01 212.2,2025 X403.17@250,2025 ; C407.2@233.17,1837.01 233.17,1806.34 240,1799.51 1099.21,1799.51 1111.71,1787.01 1111.71,1587.01 1124.21,1574.51 1161.71,1574.51 1174.21,1562.01 1174.21,1524.51 1186.71,1512.01 1280.46,1512.01 1310,1482.47 1310,1350 ; X402.2@1150,1325 1150,1315 1181.53,1283.47 C402.2@1246.09,1283.47 1289.72,1283.47 1310,1303.75 1310,1350 ; v1(2095,1005) 2095,1257.8 2002.8,1350 1310,1350 ; R100-2.2@2266.09,475 2266.09,453.28 2281.25,438.12 v1(2281.25,437.5) ; R104-2.2@2381.34,475 2381.34,446.7 v1(2391.04,437) ; R101-2.2@2496.65,475 2496.65,447.1 v1(2506.25,437.5) ; R105-2.2@2615.37,475 2615.37,446.64 v1(2625,437.01) ; R102-2.2@2736.22,475 2736.22,445.03 v1(2743.75,437.5) ; R106-2.2@2857.44,475 2857.44,442.07 v1(2862.5,437.01) ; R103-2.2@2973.95,475 2973.95,445.42 v1(2981.25,438.12) ; R107-2.2@3091.19,475 3091.19,446.93 v1(3100,438.12) ; C100-2.2@3193.75,397.29 v1(3193.75,431.25) ; v1(3299.21,1920) 3323.42,1944.21 IC1400-2.34@3323.42,2082.38 ; IC1400-2.34@3323.43,2088.68 3323.43,2136.22 3355.95,2168.75 v1(3408.25,2168.75) 3419.44,2168.75 3456.25,2205.56 C1402-2.2@3456.25,2233.47
  Signal Layer 2 w10: v1(3193.75,431.25) 3220.48,457.98 3220.48,1007.98 3250,1037.5 3250,1870.79 v1(3299.21,1920)
  Bot Copper w6: v1(3408.25,2168.75) 3430.95,2168.75 3442.2,2180 v1(3500,2180)
  Bot Copper w10: v1(2095,1005) 2118.75,981.25 2118.75,562.5 2243.75,437.5 v1(2281.25,437.5) v1(2506.25,437.5) v1(2743.75,437.5) 3187.5,437.5 v1(3193.75,431.25)
+5.0V_VREG_0: C101-1.2 C110-1.2 C112-1.2 C113-1.2 C114-1.2 C400.2 C404.2 C605-1.2 C700-1.2 C701-1.2 C800-1.2 C801-1.2 C1403-1.2 D1100.2 IC100-1.2 IC100-1.13 IC101-1.2 IC101-1.13 IC101-1.16 IC102-1.2 IC102-1.13 IC102-1.15 IC800-1.8 IC801-1.1 IC1400-1.37 IC1400-1.40 L600-1.2 LD1400-1.2 R606-1.1 R607-1.1 R700-1.2 R701-1.2 R702-1.2 R703-1.2 R704-1.2 R705-1.2 R706-1.2 R707-1.2 R708-1.1 R800-1.2 R801-1.2 R1401-1.2 R1402-1.2 R1404-1.2 R1408-1.2 R1411-1.2 R1415-1.2 R1416-1.2 TP1402-1.1 U100-1.5 U101-1.5 U700-1.1 U700-1.16 X401.9 X402.3 | length 4017.9
  Top Copper w6: IC102-1.2@464,2473.5 504.75,2473.5 v1(506.25,2475) ; IC101-1.2@851.5,2473.5 v1(905.99,2473.5) ; U101-1.5@1067.91,2522.4 1038.32,2522.4 1026.77,2510.85 1026.77,2429.43 1077.75,2378.45 C112-1.2@1077.75,2374.51 1105.35,2374.51 1115.17,2384.33 1133.25,2384.33 1133.37,2384.45 1209.45,2384.45 1225,2400 v1(1225,2462) ; R707-1.2@3249.21,927.07 v1(3249.21,955) ; U700-1.16@3287.8,610.43 3287.8,587.6 3308.96,566.44 C701-1.2@3308.96,562.5 v1(3308.96,520.88) ; R706-1.2@3311.71,927.07 v1(3311.71,955) ; R705-1.2@3374.21,927.07 v1(3374.21,955) ; R704-1.2@3436.71,927.07 v1(3436.71,955) ; R703-1.2@3499.21,927.07 v1(3499.21,955) ; U700-1.1@3512.2,610.43 3512.2,577.4 3497.31,562.5 C700-1.2@3478.54,562.5 3478.54,558.56 3493.97,543.13 3522.64,543.13 v1(3530,550.49) ; R702-1.2@3561.71,927.07 v1(3561.71,955) ; v1(3575,561.96) R708-1.1@3575,597.44 ; R701-1.2@3624.21,927.07 v1(3624.21,955) ; R700-1.2@3686.71,927.07 v1(3686.71,955) ; IC100-1.13@3791.09,843.45 3849.21,843.45 3877.71,871.95 C101-1.2@3877.71,1002.31 ; v1(3847.86,941.11) 3847.86,972.46 C101-1.2@3877.71,1002.31 ; C101-1.2@3877.71,1006.25 C101-1.2@3877.71,1002.31 ; IC100-1.2@4021.41,792.27 4110.83,792.27 v1(4134.36,768.75) ; v1(4931.25,2481.25) R801-1.2@4959.94,2481.25 ; IC801-1.1@5034.74,2350.1 5056.46,2350.1 5066.35,2340.21 C801-1.2@5093.75,2340.21 v1(5093.75,2311.12) ; v1(5249.21,2324.51) 5261.71,2324.51 5271.09,2315.13 R1401-1.2@5271.09,2291.54 ; IC1400-1.40@5305.31,2088.68 5305.31,2030.91 5328.05,2008.17 5349.04,2008.17 5364.37,2023.5 IC1400-1.37@5364.37,2088.68 ; v1(5386.71,2324.51) 5424.21,2324.51 5433.59,2315.13 R1402-1.2@5433.59,2291.54 ; LD1400-1.2@5441.24,2399.51 LD1400-1.2@5447.56,2399.51 TP1402-1.1@5511.71,2399.51 v1(5611.71,2399.51) ; R1411-1.2@5890.06,2112.5 5890.06,2116.44 5912.99,2139.37 v1(5912.99,2153.74) ; R1408-1.2@5890.06,2225 5890.06,2228.94 5912.99,2251.87 v1(5912.99,2262.8) ; R1404-1.2@5890.06,2337.5 5890.06,2333.56 5912.5,2311.12 v1(5912.5,2300)
  Top Copper w10: IC102-1.15@234.84,2473.52 194.43,2473.52 185,2482.95 185,2515 194.7,2524.7 IC102-1.13@234.84,2524.7 290.3,2524.7 330,2485 v1(330,2455) 330,2425.44 328.05,2423.49 C114-1.2@328.05,2400.79 ; v1(565,2592) 558,2585 C113-1.2@558,2556.54 558,2535 568.3,2524.7 IC101-1.13@622.34,2524.7 662.76,2524.7 672.46,2515 672.46,2457.64 662.76,2447.93 IC101-1.16@622.34,2447.93 ; C400.2@1040.25,1512.01 1040.25,1489.31 1050,1479.56 X402.3@1050,1425 ; C404.2@1161.71,1703.05 1228.05,1703.05 X401.9@1250,1725 ; D1100.2@3968.65,2060.14 3968.65,2032.41 3985.11,2015.95 v1(4159.57,2015.95) ; U100-1.5@4218.66,836.62 4270.34,836.62 4289.93,856.2 C110-1.2@4293.87,856.2 v1(4293.87,818.87) ; v1(5299.21,2174.51) 5313.29,2174.51 5325,2186.22 ; C1403-1.2@5325,2233.96 5325,2186.22 ; IC1400-1.37@5364.37,2088.68 5364.37,2146.85 5325,2186.22 ; R1416-1.2@5799.21,1847.56 5803.15,1847.56 5817.74,1862.15 v1(5817.74,1878.25) ; R1415-1.2@5800,1977.56 5800,2006.34 v1(5812.5,2018.84) ; IC800-1.8@5881.2,1800 5945,1800 5958.17,1786.83 C800-1.2@5958.17,1737.01 5929.08,1737.01 v1(5909.84,1756.25) ; v1(5910,2060) 5989.28,2060 6015.06,2034.22 R800-1.2@6015.06,2012.5
  VREG w6: v1(506.25,2475) 525,2475
  VREG w10: 550,2612.5 565,2597.5 v1(565,2592)
  other v1: 4970,2030 5000,2030 4955,2060 4985,2060 4970,2090 5000,2090 4955,2120 4985,2120
+5.0V_VREG_1: C101-2.2 C110-2.2 C112-2.2 C113-2.2 C114-2.2 C403.2 C406.2 C605-2.2 C700-2.2 C701-2.2 C800-2.2 C801-2.2 C1403-2.2 D1100.1 IC100-2.2 IC100-2.13 IC101-2.2 IC101-2.13 IC101-2.16 IC102-2.2 IC102-2.13 IC102-2.15 IC800-2.8 IC801-2.1 IC1400-2.37 IC1400-2.40 L600-2.2 LD1400-2.2 R606-2.1 R607-2.1 R700-2.2 R701-2.2 R702-2.2 R703-2.2 R704-2.2 R705-2.2 R706-2.2 R707-2.2 R708-2.1 R800-2.2 R801-2.2 R1400-2.2 R1402-2.2 R1404-2.2 R1408-2.2 R1411-2.2 R1415-2.2 R1416-2.2 TP1402-2.1 U100-2.5 U101-2.5 U700-2.1 U700-2.16 X402.4 X404.9 | length 4150.2
  Top Copper w6: IC102-2.2@464,2186 504.75,2186 v1(506.25,2187.5) ; IC101-2.2@851.5,2186 892.94,2186 v1(894.09,2187.16) ; U101-2.5@1067.91,2249.02 1056.1,2249.02 1026.77,2219.68 1026.77,2161.85 1043.62,2145 1051.99,2145 C112-2.2@1083.54,2113.45 ; C112-2.2@1083.54,2109.51 C112-2.2@1083.54,2113.45 ; v1(1124.21,2165.29) 1124.21,2154.11 C112-2.2@1083.54,2113.45 ; R707-2.2@2149.21,927.07 v1(2149.21,960) ; U700-2.16@2193.26,603.19 2193.26,564.69 2202.69,555.26 C700-2.2@2221.46,555.26 v1(2221.46,512.93) ; R706-2.2@2211.71,927.07 v1(2211.71,960) ; R705-2.2@2274.21,927.07 v1(2274.21,960) ; R704-2.2@2336.71,927.07 v1(2336.71,960) ; R703-2.2@2399.21,927.07 v1(2399.21,960) ; U700-2.1@2417.66,603.19 2417.66,561.41 2411.51,555.26 C701-2.2@2391.04,555.26 2391.04,551.32 2408.9,533.47 v1(2433.07,533.47) ; R702-2.2@2461.71,927.07 v1(2461.71,960) ; v1(2474.21,546.85) 2479.67,552.31 R708-2.1@2479.67,587.64 ; R701-2.2@2524.21,927.07 v1(2524.21,960) ; R700-2.2@2586.71,927.07 v1(2586.71,955.46) ; IC100-2.13@2703.59,843.45 2780.78,843.45 2808.75,871.43 2808.75,935.22 2849.57,976.04 2992.3,976.04 3002.3,966.04 C101-2.2@3025,966.04 3087.57,966.04 v1(3112.5,941.11) ; v1(2787.5,2424.9) 2787.5,2466 2802.75,2481.25 R801-2.2@2853.69,2481.25 ; IC100-2.2@2933.91,792.27 3006.94,792.27 3021.83,777.38 3021.83,658.78 v1(3031.5,649.11) ; IC801-2.1@2934.74,2350.1 2956.46,2350.1 2966.35,2340.21 C801-2.2@2993.75,2340.21 v1(2993.75,2311.98) ; v1(3136.71,2324.51) 3161.71,2324.51 3171.09,2315.13 R1400-2.2@3171.09,2291.54 ; IC1400-2.40@3205.32,2088.68 3205.32,2019.69 3220,2005 3221.82,2003.17 3248.17,2003.17 3264.37,2019.37 IC1400-2.37@3264.37,2088.68 ; v1(3324.21,2324.51) 3333.59,2315.13 R1402-2.2@3333.59,2291.54 ; LD1400-2.2@3341.24,2399.51 TP1402-2.1@3411.71,2399.51 v1(3474.21,2399.51) ; R1411-2.2@3790.06,2112.5 v1(3818.75,2112.5) ; R1408-2.2@3790.06,2228.94 R1408-2.2@3790.06,2225 v1(3817.93,2225) ; R1404-2.2@3790.06,2333.56 R1404-2.2@3790.06,2337.5 v1(3820,2337.5)
  Top Copper w10: IC102-2.15@234.84,2186.02 194.43,2186.02 180,2200.45 180,2222.78 194.43,2237.2 IC102-2.13@234.84,2237.2 302.8,2237.2 374.71,2165.29 374.71,2115 ; C114-2.2@328.05,2113.29 373,2113.29 374.71,2115 ; v1(463.75,2081.25) 400.5,2081.25 374.71,2107.04 374.71,2115 ; v1(565,2297) 565,2292 556.25,2283.25 C113-2.2@556.25,2254.34 560.19,2254.34 577.32,2237.2 IC101-2.13@622.34,2237.2 ; v1(577,2129) 604,2129 622.34,2147.34 IC101-2.16@622.34,2160.43 ; C403.2@1040.25,1237.01 1040.25,1315.25 X402.4@1050,1325 ; v1(1162.5,2160.43) 1161.71,2159.64 C406.2@1161.71,2003.05 1228.05,2003.05 X404.9@1250,2025 ; U100-2.5@3124.9,740.26 3171.11,740.26 3189.81,758.96 C110-2.2@3193.75,758.96 v1(3193.75,726.71) ; v1(3199.21,2174.51) 3224.21,2199.51 ; C1403-2.2@3224.21,2233.47 3224.21,2199.51 ; IC1400-2.37@3264.37,2088.68 3264.37,2146.85 3224.21,2187.01 3224.21,2199.51 ; v1(3693.75,2006.25) 3693.75,1997.26 3699.21,1991.8 R1415-2.2@3699.21,1974.02 ; R1416-2.2@3695.27,1850.79 R1416-2.2@3699.21,1850.79 v1(3699.21,1878.25) ; IC800-2.8@3765.27,1800.25 3844.75,1800.25 3858.17,1786.83 C800-2.2@3858.17,1737.01 3812.99,1737.01 v1(3812.5,1737.5) ; v1(3806.25,2050) 3806.25,2044.64 3834.94,2015.95 R800-2.2@3834.94,2012.01 ; v1(3856.25,2060) 3856.39,2060.14 D1100.1@3893.85,2060.14
  VREG w6: v1(506.25,2187.5) 518.75,2187.5 ; v1@575,2125 577,2127 v1(577,2129)
  VREG w10: v1(463.75,2081.25) 481.25,2081.25 487.5,2075 ; v1(565,2297) 565,2315 575,2325
  other v1: 2870,2030 2900,2030 2855,2060 2885,2060 2870,2090 2900,2090 2855,2120 2885,2120
BST_0: C601-1.2 U600-1.11 | length 80.2
  Top Copper w16: U600-1.11@4512.12,1962.47 4558.08,1962.47 4579.54,1983.92 C601-1.2@4583.48,1983.92
BST_1: C601-2.2 U600-2.11 | length 80.2